# Altium PCB main.PcbDoc (part 2 of 2)
Units mm, origin at the board's own origin, x right, y up, seen from the top; angles counter-clockwise.
Board outline 42 x 60.8 mm, 6 copper layers (Layer 1, Layer 2, Layer3, Layer4, Layer 5, Layer 6), stack 0.816 mm thick; 77 components, 64 nets, 292 pads, 154 vias.
Unrouted connection lines stored in the file: 1.
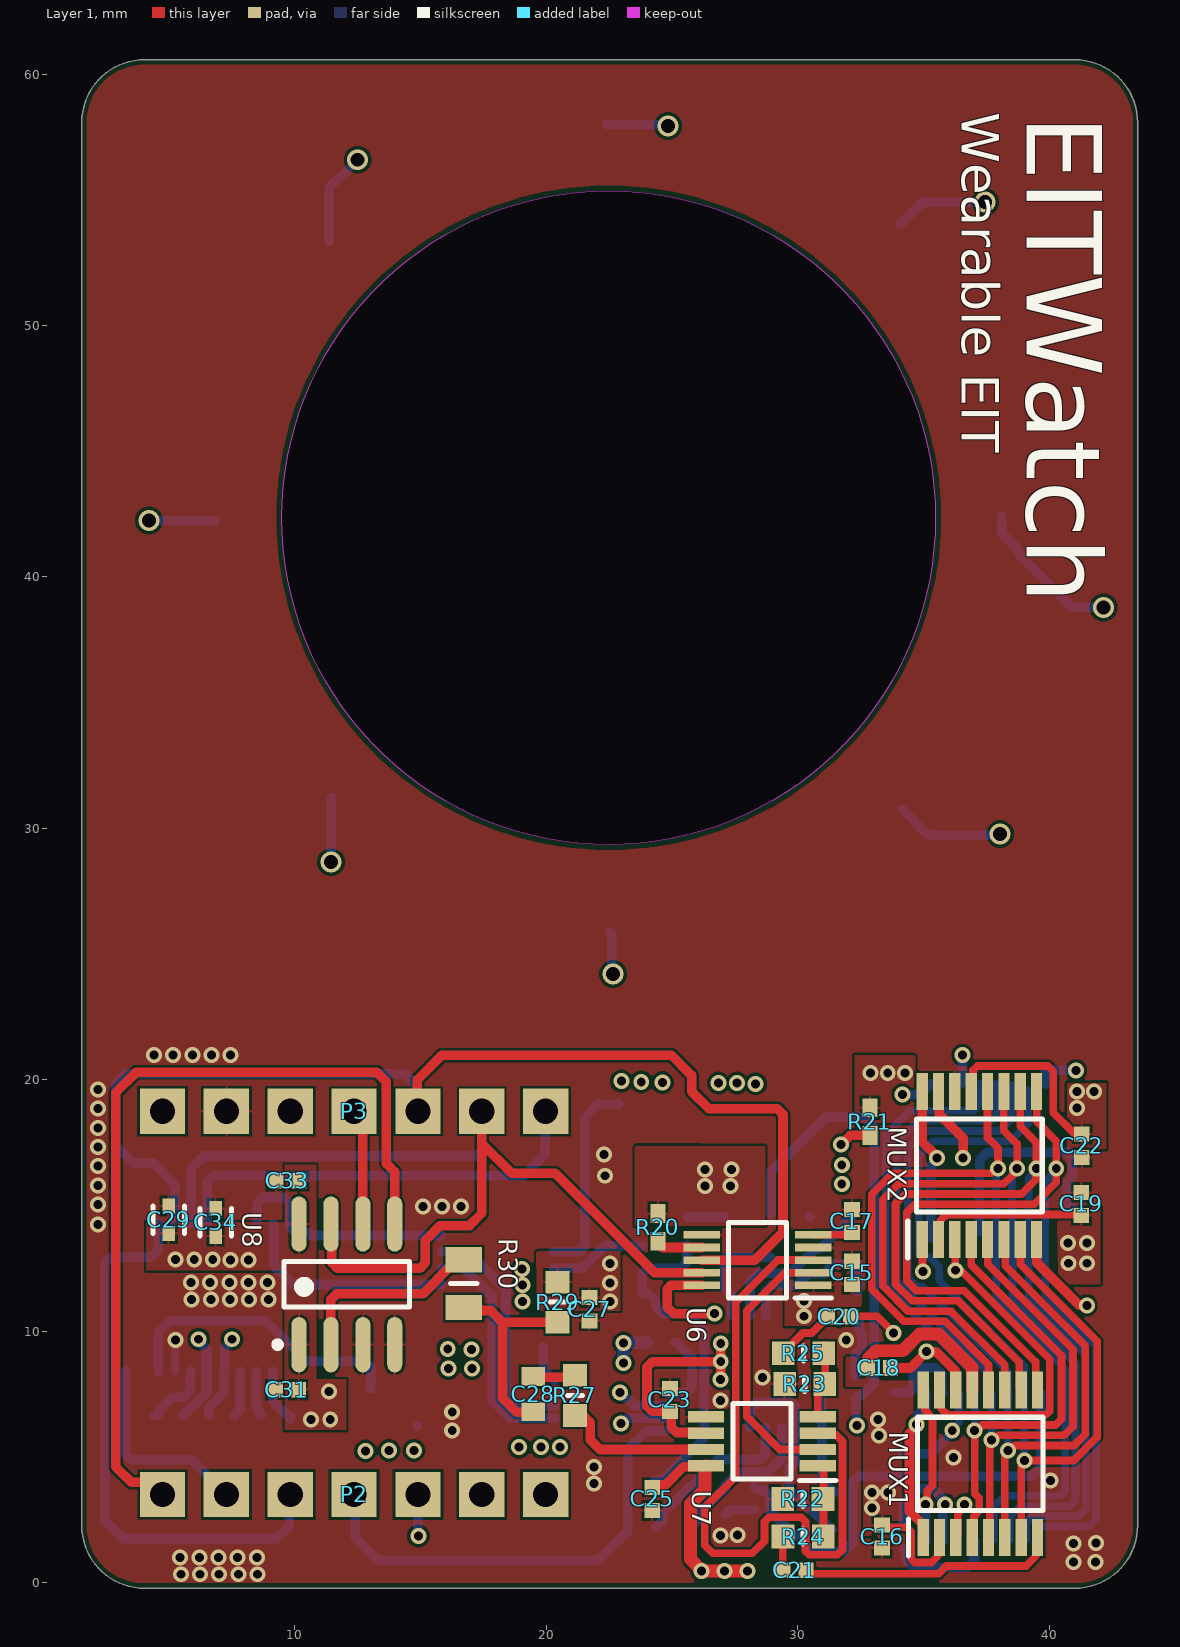
[diagram p0: Layer 1 view]

## Silkscreen, mask and mechanical layers (free items; w line width, h text height) (continued)
Mechanical 1: (continued)
  lines w0.254: 1.518,2.271 ccw(c4.018,2.271) 4.018,-0.229 41.018,-0.229 ccw(c41.018,2.271) 43.518,2.271 43.518,58.071 ccw(c41.018,58.071) 41.018,60.571 4.018,60.571 ccw(c4.018,58.071) 1.518,58.071 1.518,2.271

## Dimensions
22.396,57.995 to 22.557,26.707 on Mechanical 1
41.018,60.571 to 41.018,-0.229 on Mechanical 1
1.518,58.071 to 43.518,58.071 on Mechanical 1